# Altium PCB SOM_PCB_BLUETECHNIX.PcbDoc (part 3 of 8)
Units mil, origin at the board's own origin, x right, y up, seen from the top; angles counter-clockwise.
Board outline 1225 x 1620 mil, 8 copper layers (Top Layer, Int1 (Sign), Int2 (GND), Int3 (Sign), Int4 (Sign), Int5 (PWR), Int6 (Sign), Bottom Layer), stack 66.2 mil thick; 65 components, 201 nets, 938 pads, 497 vias.
Unrouted connection lines stored in the file: 25.
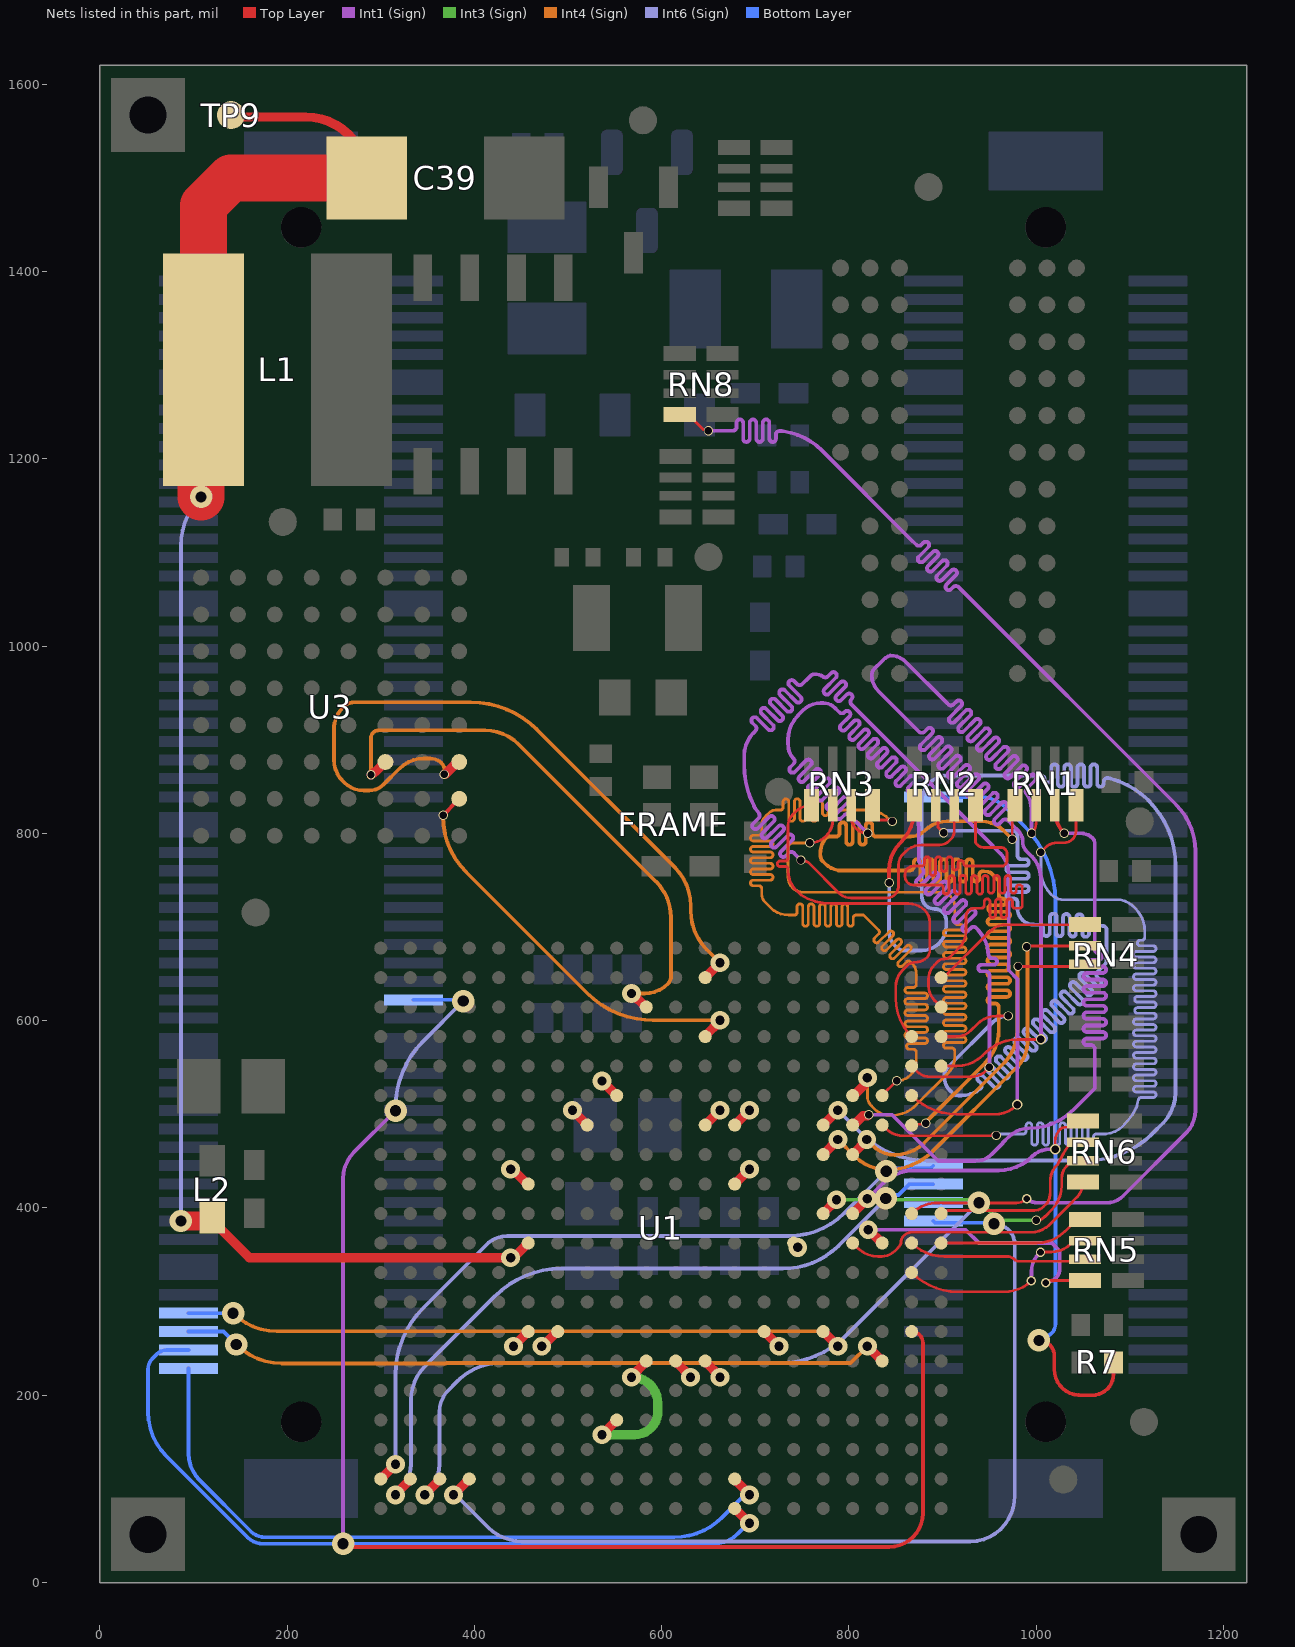
[diagram p8: the nets of this part, all layers, seen from the top]

## Via types
v1: diameter 20, hole 10, Top Layer to Int2 (GND), tented both sides, 68 vias
v2: diameter 10, hole 8, Top Layer to Int3 (Sign), tented both sides, 53 vias
v3: diameter 20, hole 10, Top Layer to Bottom Layer, tented both sides, 44 vias
v4: diameter 10, hole 8, Top Layer to Int1 (Sign), tented both sides, 41 vias
v5: diameter 20, hole 10, Top Layer to Int5 (PWR), tented both sides, 40 vias
v6: diameter 10, hole 8, Top Layer to Int4 (Sign), tented both sides, 33 vias
v7: diameter 20, hole 10, Top Layer to Int3 (Sign), tented both sides, 25 vias
v8: diameter 24, hole 12, Int6 (Sign) to Bottom Layer, tented both sides, 22 vias
v9: diameter 20, hole 10, Top Layer to Int4 (Sign), tented both sides, 19 vias
v10: diameter 24, hole 12, Int4 (Sign) to Bottom Layer, tented both sides, 17 vias
v11: diameter 24, hole 12, Int2 (GND) to Bottom Layer, tented both sides, 15 vias
v12: diameter 20, hole 10, Top Layer to Int1 (Sign), tented both sides, 13 vias
v13: diameter 24, hole 12, Top Layer to Int6 (Sign), tented both sides, 11 vias
v14: diameter 24, hole 12, Top Layer to Int4 (Sign), tented both sides, 10 vias
v15: diameter 24, hole 12, Top Layer to Int3 (Sign), tented both sides, 8 vias
v16: diameter 11, hole 8, Top Layer to Int1 (Sign), tented both sides, 8 vias
v17: diameter 10, hole 8, Top Layer to Bottom Layer, tented both sides, 7 vias
v18: diameter 20, hole 10, Top Layer to Int6 (Sign), tented both sides, 7 vias
v19: diameter 10, hole 8, Top Layer to Int6 (Sign), tented both sides, 6 vias
v20: diameter 10, hole 8, Int4 (Sign) to Bottom Layer, tented both sides, 6 vias
v21: diameter 24, hole 12, Int1 (Sign) to Bottom Layer, tented both sides, 5 vias
v22: diameter 24, hole 12, Top Layer to Int2 (GND), tented both sides, 5 vias
v23: diameter 10, hole 7, Top Layer to Int1 (Sign), tented both sides, 4 vias
v24: diameter 10, hole 8, Top Layer to Int2 (GND), tented both sides, 4 vias
v25: diameter 10, hole 8, Int2 (GND) to Bottom Layer, tented both sides, 4 vias
v26: diameter 24, hole 12, Int3 (Sign) to Bottom Layer, tented both sides, 4 vias
v27: diameter 24, hole 12, Top Layer to Bottom Layer, tented both sides, 4 vias
v28: diameter 10, hole 8, Int5 (PWR) to Bottom Layer, tented both sides, 3 vias
v29: diameter 20, hole 10, Int2 (GND) to Bottom Layer, tented both sides, 2 vias
v30: diameter 10, hole 8, Int6 (Sign) to Bottom Layer, tented both sides, 2 vias
v31: diameter 10, hole 8, Top Layer to Bottom Layer, 1 vias
v32: diameter 22, hole 12, Int2 (GND) to Bottom Layer, tented both sides, 1 vias
v33: diameter 24, hole 10, Int2 (GND) to Bottom Layer, tented both sides, 1 vias
v34: diameter 20, hole 12, Top Layer to Int5 (PWR), tented both sides, 1 vias
v35: diameter 20, hole 12, Top Layer to Int2 (GND), tented both sides, 1 vias
v36: diameter 24, hole 12, Top Layer to Int5 (PWR), tented both sides, 1 vias
v37: diameter 24, hole 12, Top Layer to Int1 (Sign), tented both sides, 1 vias

## Nets (pads, with @x,y where several pads share a name; then routed paths per layer and width w, separated by ;. In a path a pad name is that pad's centre, name@x,y a point inside that pad or via, vN(x,y) a via of type N, cw(c..) or ccw(c..) an arc to the next point about the centre after c; other vN are vias at no path point) (continued)
+VDD_INT: C39.1 L1.2 L2.1 TP9.0 U1.F9 U1.G8 U1.G12 U1.G13 U1.J6 U1.J13 U1.L6 U1.L15 U1.P6 U1.P7 U1.P14 U1.R10 U1.R11 U1.R12 U1.U9 | length 2289.2
  Top Layer w10: L2.1@116.57,386.06 L2.1@120,389.49 120,386.54 159.76,346.77 v3(438.66,346.77) 441.77,346.77 U1.L6@457.52,362.52 ; TP9.0@140.16,1565 220,1565 cw(c220,1500) C39.1@285,1500 ; v3(438.66,441.26) 440.69,441.26 456.44,425.51 U1.J6@457.52,425.51 ; v5(441.77,252.28) U1.P6@457.52,268.03 ; v5(472.01,252.28) 472.64,252.28 488.39,268.03 U1.P7@489.02,268.03 ; v5(504.76,504.25) U1.G8@520.51,488.5 ; v5(536.26,157.8) U1.U9@552.01,173.54 ; v5(536.26,535.5) 536.38,535.5 551.88,520 U1.F9@552.01,520 ; v5(567.76,219.34) 567.76,220.06 583.5,235.81 U1.R10@583.5,236.54 ; U1.R11@615,236.54 615,235.81 630.75,220.06 v5(630.75,219.34) ; U1.R12@646.5,236.54 646.5,235.81 662.24,220.06 v5(662.24,219.34) ; U1.G12@646.5,488.5 v5(662.24,504.25) ; U1.J13@677.99,425.51 v5(693.74,441.26) ; U1.G13@677.99,488.5 v5(693.74,504.25) ; U1.P14@709.49,268.03 v5(725.24,252.28) ; U1.L15@740.98,362.52 745.38,358.12 v5(745.38,357.87)
  Top Layer w20: v13(86.59,386.06) L2.1@116.57,386.06
  Top Layer w50: v13(108.15,1159.32) 108.15,1292.28 L1.2@110.87,1295 110.87,1470.71 140.16,1500 C39.1@285,1500
  Int3 (Sign) w10: v5(536.26,157.8) 570.91,157.8 ccw(c570.91,182.83) 593.52,172.08 ccw(c570.91,182.83) 595.95,182.83 595.95,191.15 ccw(c567.76,191.15) v5(567.76,219.34)
  Int6 (Sign) w4: v13(86.59,386.06) 86.59,1107.27 cw(c160.2,1107.27) v13(108.15,1159.32)
A\O\E\: U1.C10 U3.F6 | length 611.2
  Top Layer w10: v6(289.61,862.71) 291.2,863.57 ccw(c285,875) 294.04,865.66 U3.F6@305,876.26 ; v9(567.76,629) 568.37,629 582.89,614.49 U1.C10@583.5,614.49
  Int4 (Sign) w4: v6(289.61,862.71) 289.61,901.92 cw(c297.69,901.92) 290.4,905.4 cw(c297.69,901.92) 294.22,909.22 cw(c297.69,901.92) 297.69,910 411.31,910 cw(c411.31,858.86) 447.45,895.05 ; 447.47,895.02 593.75,748.75 cw(c554.51,709.51) 610,709.51 610,647.51 cw(c598.3,647.51) 606.57,639.24 cw(c581.86,663.95) 581.86,629 v9(567.76,629)
A\R\E\: U1.B12 U3.F8 | length 803.1
  Top Layer w10: v6(367.93,862.93) 368.51,862.93 381.85,876.26 U3.F8@383.74,876.26 ; U1.B12@646.5,645.98 v9(662.24,661.73)
  Int4 (Sign) w4: v6(367.93,862.93) 367.93,867.93 ccw(c357.93,867.93) 365,875 ccw(c352.93,862.93) 352.93,880 345.84,880 ccw(c345.84,844.03) 320.41,869.47 303,852.06 cw(c287.68,867.38) 287.68,845.71 281.99,845.71 cw(c281.99,875.27) 261.09,854.37 256.9,858.57 cw(c284.14,879.14) 250,879.14 250,910.86 cw(c284.14,910.86) 250.72,917.84 cw(c284.14,910.86) 260,935 cw(c272.07,922.93) 272.07,940 396.14,940 cw(c396.14,840) 466.85,910.71 614.09,763.47 cw(c573.39,722.77) 630.95,722.77 630.95,718.03 ccw(c691.31,718.03) 648.61,675.37 ; 648.63,675.35 v9(662.24,661.73)
A\W\E\: U1.D12 U3.G8 | length 448.6
  Top Layer w4: v6(366.69,819.33) 366.88,819.14 U3.G8@383.25,836.89
  Top Layer w10: U3.G8@383.25,836.89 U3.G8@383.74,836.89 ; U1.D12@646.5,582.99 646.5,583.87 662.24,599.62 v3(662.24,600.5)
  Int4 (Sign) w4: v6(366.69,819.33) 366.69,818.89 366.42,818.63 ccw(c451.62,818.63) 391.37,758.39 519.96,629.79 ccw(c590.67,700.5) 573.57,601.97 ccw(c590.67,700.5) 590.67,600.5 v3(662.24,600.5)
ATAPI_PDIAG: FRAME.134 U1.P19 | length 1522.4
  Top Layer w4: v37(259.75,41.31) 263.06,38 842.88,38 ccw(c842.88,74.08) 878.97,74.08 878.97,256.03 ccw(c866.97,256.03) U1.P19@866.97,268.03
  Int1 (Sign) w4: v37(259.75,41.31) 259.75,431.18 cw(c299.95,431.18) 271.53,459.61 v13(315.79,503.87)
  Int6 (Sign) w4: v13(315.79,503.87) 315.79,507.07 cw(c415.79,507.07) 345.08,577.78 v8(388.15,620.86)
  Bottom Layer w4: FRAME.134@335,622.28 386.73,622.28 v8(388.15,620.86)
B\R\: FRAME.76 R7.2 | length 827.6
  Top Layer w4: v14@1009.94,258.51 v14(1002.85,258.51) cw(c1002.85,242.03) 1019.32,242.03 1019.32,227.41 ccw(c1046.64,227.41) 1045.19,200.13 ccw(c1046.64,227.41) 1046.64,200.09 1060,200.09 ccw(c1060,222.61) 1082.52,222.61 R7.2@1082.52,235
  Bottom Layer w4: FRAME.76@890.12,838.82 939.58,838.82 cw(c939.58,798.74) 967.91,827.09 987.16,807.84 cw(c906.67,727.35) 1020.5,727.35 1020.5,276.15 cw(c1006.4,276.15) 1006.4,262.05 v10@1002.86,258.51
  other v10: 1002.85,258.51
BMODE0: FRAME.60 U1.W1 | length 799.8
  Top Layer w10: U1.W1@300.04,110.55 v3(315.79,126.3)
  Int6 (Sign) w4: v3(315.79,126.3) 315.79,170.1 315.79,222.13 cw(c415.79,222.13) 345.08,292.84 414.99,362.75 cw(c435.32,337.85) 435.32,370 735.7,370 ccw(c735.7,454.06) 795.1,394.58 ccw(c735.7,454.06) 795.14,394.62 v8(839.73,439.21)
  Bottom Layer w4: v8(839.73,439.21) 842.68,442.17 887.17,442.17 FRAME.60@890.12,445.12
BMODE1: FRAME.59 U1.W2 | length 785.7
  Top Layer w10: v3(315.79,93.55) 315.79,94.18 331.54,109.92 U1.W2@331.54,110.55
  Int6 (Sign) w4: v3(315.79,93.55) 315.79,94.8 v3@321.57,100.59 ; v3@321.59,100.61 ccw(c295.72,126.44) 332.28,126.44 332.28,174.98 332.28,194.86 cw(c383.5,194.86) 347.25,231.04 ; 347.28,231.07 422.17,305.96 cw(c492.88,235.25) 492.88,335.25 729.44,335.25 ccw(c729.44,420.02) 760.4,341.1 ccw(c729.44,420.02) 789.38,360.08 v8(839.41,410.1)
  Bottom Layer w4: v8(839.41,410.1) 843.24,413.93 853.03,413.93 864.53,425.43 FRAME.59@890.12,425.43
BMODE2: FRAME.58 U1.W3 | length 833.7
  Top Layer w10: v3(347.06,93.55) 347.06,94.07 363.03,110.03 U1.W3@363.03,110.55
  Int6 (Sign) w4: v3(347.06,93.55) 347.06,93.86 348.31,95.83 351.22,98.74 ccw(c323.66,126.3) 362.64,126.3 362.64,181.98 cw(c396.38,181.98) 370.41,203.51 382.65,215.76 cw(c427.51,170.91) 385.56,218.49 cw(c427.51,170.91) 423.57,234.22 cw(c427.51,170.91) 427.51,234.34 726.16,234.34 ccw(c726.16,334.34) 796.87,263.63 v8(938.75,405.52)
  Bottom Layer w4: FRAME.58@890.12,405.75 890.23,405.63 938.64,405.63 v8(938.75,405.52)
BMODE3: FRAME.57 U1.W4 | length 1038.5
  Top Layer w10: v3(377.76,93.55) 377.76,93.67 394.53,110.43 U1.W4@394.53,110.55
  Int6 (Sign) w4: v3(377.76,93.55) 380.03,93.55 414.59,59 ccw(c451.35,95.77) 451.35,43.77 929.58,43.77 ccw(c929.58,90.1) 962.34,57.34 ccw(c926.94,92.73) 977,92.73 977,361.45 ccw(c955.94,361.45) 956.73,382.5 v8(954.91,383.02)
  Bottom Layer w4: FRAME.57@890.12,386.06 891.89,384.29 951.98,384.29 v8(954.91,383.02)
CAN0_RX: FRAME.153 U1.R18 | length 765.8
  Top Layer w10: v9(819.72,252.28) U1.R18@835.47,236.54
  Int4 (Sign) w4: v10(145.83,254.17) ccw(c194.5,302.85) 194.5,234.01 369.56,234.01 369.89,234.34 801.78,234.34 v9(819.72,252.28)
  Bottom Layer w4: FRAME.153@94.84,267.95 132.05,267.95 v10(145.83,254.17)
CAN0_TX: FRAME.154 U1.P16 | length 727.5
  Top Layer w10: U1.P16@772.48,268.03 v9(788.23,252.28)
  Int4 (Sign) w4: v10(142.36,287.64) ccw(c189.21,334.49) 189.21,268.23 772.28,268.23 v9(788.23,252.28)
  Bottom Layer w4: FRAME.154@94.84,287.64 v10(142.36,287.64)
CAN1_RX: FRAME.151 U1.W13 | length 772.9
  Top Layer w10: U1.W13@677.99,110.55 677.99,109.92 693.74,94.18 v3(693.74,93.55)
  Bottom Layer w4: FRAME.151@94.84,228.58 94.84,137.51 ccw(c134.41,137.51) 106.43,109.53 161.27,54.69 ; 161.29,54.67 ccw(c176.68,70.1) 176.68,48.31 613.35,48.31 ccw(c613.35,120.63) 664.44,69.44 664.51,69.51 688.33,93.33 v3(693.74,93.55)
CAN1_TX: FRAME.152 U1.Y13 | length 842.6
  Top Layer w10: U1.Y13@677.99,79.06 v3(693.74,63.31)
  Bottom Layer w4: FRAME.152@94.84,248.27 71.22,248.27 ccw(c71.22,234.01) 61.14,244.09 56.34,239.29 ccw(c67.93,227.7) 51.54,227.7 51.54,182.36 ccw(c118.74,182.36) 71.22,134.84 157.75,48.31 ccw(c174.65,65.21) 174.65,41.31 655.09,41.31 ccw(c655.09,78.86) 681.62,52.28 ; 681.65,52.31 692.65,63.31 v3(693.74,63.31)
DDR_A0: RN1.1 U1.G19 | length 1410
  Top Layer w3: U1.G19@866.97,488.5 867.91,489.45 880.9,489.45 v6(881.84,490.39) ; v6(974.41,793.78) 974.41,827.05 RN1.1@977.36,830
  Int4 (Sign) w4: 788.77,760.44 791.89,760.44 ; 880.85,802.82 cw(c865.72,817.97) 865.72,796.56 841.5,796.56 829,796.56 cw(c829,800.56) 825,800.56 825,808.27 ccw(c821.5,808.27) 818,808.27 818,791.27 cw(c814.5,791.27) 811,791.27 811,808.27 ccw(c807.5,808.27) 804,808.27 804,791.27 cw(c800.5,791.27) 797,791.27 797,808.27 ccw(c793.5,808.27) 790,808.27 790,800.56 cw(c786,800.56) 786,796.56 784,796.56 778.72,796.56 ccw(c778.72,792.84) 776.08,795.47 ccw(c792.05,779.5) 769.58,781.77 ccw(c792.05,779.5) 769.47,779.5 769.47,777.49 ccw(c783.93,777.49) 770.77,771.5 774.71,767.56 ccw(c791.89,784.75) 791.89,760.44 ; 880.88,802.86 cw(c905,778.69) 905,812.83 941.21,812.83 cw(c941.21,778.69) 965.33,802.86 v6(974.41,793.78) ; v6(881.84,490.39) 881.84,491.25 945.44,554.86 ccw(c910.3,590) 960,590 960,612.35 960,614.35 ccw(c956,614.35) 956,618.35 951.5,618.35 cw(c951.5,621.85) 951.5,625.35 968.5,625.35 ccw(c968.5,628.85) 968.5,632.35 951.5,632.35 cw(c951.5,635.85) 951.5,639.35 968.5,639.35 ccw(c968.5,642.85) 968.5,646.35 951.5,646.35 cw(c951.5,649.85) 951.5,653.35 967.07,653.35 ccw(c967.07,656.85) 967.07,660.35 951.5,660.35 cw(c951.5,663.85) 951.5,667.35 968.5,667.35 ccw(c968.5,670.85) 968.5,674.35 951.5,674.35 cw(c951.5,677.85) 951.5,681.35 968.5,681.35 ccw(c968.5,684.85) 968.5,688.35 951.5,688.35 cw(c951.5,691.85) 951.5,695.35 968.5,695.35 ccw(c968.5,698.85) 968.5,702.35 951.5,702.35 cw(c951.5,705.85) 951.5,709.35 968.5,709.35 ccw(c968.5,712.85) 968.5,716.35 952.24,716.35 cw(c952.24,719.85) 952.24,723.35 964,723.35 ccw(c964,726.85) 964,730.35 cw(c964,734.35) 960,734.35 960,743.54 960,749.26 951.2,758.06 ccw(c937.33,718.85) 950.56,758.28 ccw(c937.33,718.85) 948.56,758.89 943.76,759.56 ccw(c943.21,755.59) 939.21,755.59 939.21,751.94 cw(c935.71,751.94) 932.21,751.94 932.21,768.94 ccw(c928.71,768.94) 925.21,768.94 925.21,751.94 cw(c921.71,751.94) 918.21,751.94 918.21,768.94 ccw(c914.71,768.94) 911.21,768.94 911.21,751.94 cw(c907.71,751.94) 904.21,751.94 904.21,768.94 ccw(c900.71,768.94) 897.21,768.94 897.21,751.94 cw(c893.71,751.94) 890.21,751.94 890.21,768.94 ccw(c886.71,768.94) 883.21,768.94 883.21,751.94 cw(c879.71,751.94) 876.21,751.94 876.21,768.94 ccw(c872.71,768.94) 869.21,768.94 869.21,764.44 cw(c865.21,764.44) 865.21,760.44 863.21,760.44 791.89,760.44
DDR_A1: RN1.3 U1.G17 | length 921
  Top Layer w4: v4@820.04,498.45 v4(821.19,499.6) ; RN1.3@1019.68,830 1019.68,824.9 ccw(c1054.9,824.9) v4(1030,800)
  Top Layer w10: U1.G17@803.98,488.5 805.06,488.5 815,498.45 v4@820.04,498.45
  Int1 (Sign) w4: v4(821.19,499.6) 845.85,499.6 895.44,450 935,450 ccw(c935,474.14) 952.07,457.07 964.5,469.5 964.5,469.78 970.65,475.93 970.93,475.93 971.72,476.72 cw(c991.72,456.72) 974.7,479.31 cw(c991.72,456.72) 991.72,485 ccw(c991.72,553.28) 1040,505 1062.5,527.5 1062.5,567.9 1062.5,569.9 ccw(c1058.5,569.9) 1058.5,573.9 1054,573.9 cw(c1054,577.4) 1054,580.9 1071,580.9 ccw(c1071,584.4) 1071,587.9 1054,587.9 cw(c1054,591.4) 1054,594.9 1071,594.9 ccw(c1071,598.4) 1071,601.9 1054,601.9 cw(c1054,605.4) 1054,608.9 1071,608.9 ccw(c1071,612.4) 1071,615.9 1054,615.9 cw(c1054,619.4) 1054,622.9 1071,622.9 ccw(c1071,626.4) 1071,629.9 1054,629.9 cw(c1054,633.4) 1054,636.9 1071,636.9 ccw(c1071,640.4) 1071,643.9 1054,643.9 cw(c1054,647.4) 1054,650.9 1071,650.9 ccw(c1071,654.4) 1071,657.9 1055.73,657.9 cw(c1055.73,661.4) 1055.73,664.9 1066.5,664.9 ccw(c1066.5,668.4) 1066.5,671.9 cw(c1066.5,675.9) 1062.5,675.9 1062.5,709.37 1062.5,740.14 1062.5,788.96 ccw(c1053.96,788.96) 1060,795 ccw(c1047.93,782.93) 1047.93,800 v4(1030,800)
DDR_A2: RN1.2 U1.E20 | length 1624.5
  Top Layer w3: U1.E20@898.46,551.5 914.98,551.5 ccw(c914.98,591.37) 943.17,563.17 945.75,565.75 cw(c980.16,531.34) 980.16,580 v16(1005,580) ; v4(995,800) ccw(c982.93,812.07) 998.74,805.63 ccw(c982.93,812.07) 1000,812.07 RN1.2@1000,830
  Int1 (Sign) w4: 924.72,931.07 912.7,919.05 cw(c910.23,921.53) 907.75,919.05 cw(c910.23,921.53) 907.75,924 919.78,936.02 ccw(c917.3,938.5) 919.78,940.97 ccw(c917.3,938.5) 914.83,940.97 911.64,937.79 cw(c908.81,940.62) 905.99,937.79 904.57,939.2 860.75,983.03 ccw(c844.12,966.4) 844.12,989.92 ccw(c850,972.14) 836.76,985.38 835,983.62 827.37,976 ccw(c834.57,968.8) 824.39,968.8 ccw(c847.94,968.8) 831.29,952.15 870.1,913.33 874.92,908.51 ccw(c877.75,911.34) 880.58,908.51 883.76,911.69 cw(c886.24,909.22) 888.71,911.69 cw(c886.24,909.22) 888.71,906.74 876.69,894.72 ccw(c879.17,892.25) 876.69,889.77 ccw(c879.17,892.25) 881.64,889.77 893.66,901.79 cw(c896.14,899.32) 898.61,901.79 cw(c896.14,899.32) 898.61,896.84 886.59,884.82 ccw(c889.06,882.35) 886.59,879.87 ccw(c889.06,882.35) 891.54,879.87 903.56,891.9 cw(c906.04,889.42) 908.51,891.9 cw(c906.04,889.42) 908.51,886.95 896.49,874.92 ccw(c898.96,872.45) 896.49,869.97 ccw(c898.96,872.45) 901.44,869.97 913.46,882 cw(c915.93,879.52) 918.41,882 cw(c915.93,879.52) 918.41,877.05 906.39,865.03 ccw(c908.86,862.55) 906.39,860.08 ccw(c908.86,862.55) 911.34,860.08 923.36,872.1 cw(c925.83,869.62) 928.31,872.1 cw(c925.83,869.62) 928.31,867.15 916.29,855.13 ccw(c918.76,852.65) 916.29,850.18 ccw(c918.76,852.65) 921.24,850.18 933.26,862.2 cw(c935.73,859.72) 938.21,862.2 cw(c935.73,859.72) 938.21,857.25 926.19,845.23 ccw(c928.66,842.75) 926.19,840.28 ccw(c928.66,842.75) 931.14,840.28 943.16,852.3 cw(c945.63,849.82) 948.11,852.3 cw(c945.63,849.82) 948.11,847.35 936.09,835.33 ccw(c938.56,832.85) 936.09,830.38 ccw(c938.56,832.85) 941.04,830.38 953.06,842.4 cw(c955.53,839.92) 958.01,842.4 cw(c955.53,839.92) 958.01,837.45 945.99,825.43 ccw(c948.46,822.95) 945.99,820.48 ccw(c948.46,822.95) 950.94,820.48 962.96,832.5 cw(c965.43,830.02) 967.91,832.5 cw(c965.43,830.02) 967.91,827.55 955.89,815.53 ccw(c958.36,813.05) 955.89,810.58 ccw(c958.36,813.05) 960.84,810.58 964.02,813.76 cw(c966.85,810.93) 969.67,813.76 ; 924.72,931.07 cw(c927.2,928.6) 929.67,931.07 cw(c927.2,928.6) 929.67,926.12 917.65,914.1 ccw(c920.13,911.63) 917.65,909.15 ccw(c920.13,911.63) 922.6,909.15 934.62,921.17 cw(c937.1,918.7) 939.57,921.17 cw(c937.1,918.7) 939.57,916.22 927.55,904.2 ccw(c930.03,901.73) 927.55,899.25 ccw(c930.03,901.73) 932.5,899.25 944.52,911.27 cw(c947,908.8) 949.47,911.27 cw(c947,908.8) 949.47,906.32 937.45,894.3 ccw(c939.93,891.83) 937.45,889.35 ccw(c939.93,891.83) 942.4,889.35 954.42,901.37 cw(c956.9,898.9) 959.37,901.37 cw(c956.9,898.9) 959.37,896.42 947.35,884.4 ccw(c949.83,881.93) 947.35,879.45 ccw(c949.83,881.93) 952.3,879.45 964.32,891.47 cw(c966.8,889) 969.27,891.47 cw(c966.8,889) 969.27,886.52 957.25,874.5 ccw(c959.73,872.03) 957.25,869.55 ccw(c959.73,872.03) 962.2,869.55 974.22,881.58 cw(c976.7,879.1) 979.17,881.58 cw(c976.7,879.1) 979.17,876.63 967.15,864.6 ccw(c969.63,862.13) 967.15,859.65 ccw(c969.63,862.13) 972.1,859.65 984.12,871.68 cw(c986.6,869.2) 989.07,871.68 cw(c986.6,869.2) 989.07,866.73 977.05,854.71 ccw(c979.53,852.23) 977.05,849.76 ccw(c979.53,852.23) 982,849.76 994.02,861.78 cw(c996.5,859.3) 998.97,861.78 cw(c996.5,859.3) 998.97,856.83 989.83,847.68 ccw(c992.66,844.85) 989.15,842.92 993.26,835.49 cw(c925.68,820.06) 993.75,833.15 cw(c925.68,820.06) 995,820.06 v4(995,800) ; 969.68,813.76 971.09,812.35 974.41,809.03 980.93,802.51 cw(c969.89,791.47) 985.5,791.47 ccw(c1001.11,791.47) 990.07,780.43 995.25,775.25 cw(c971.71,751.71) 1005,751.71 v16(1005,580)
DDR_A3: RN1.4 U1.G18 | length 1569.7
  Top Layer w3: U1.G18@835.47,488.5 838.96,485.02 ccw(c858.32,504.39) 858.32,477 951.55,477 953.43,478.88 953.6,478.71 956.09,478.71 v19(957.43,477.37) ; v19(1004.95,779.95) 1010,785 cw(c1022.07,772.93) 1022.07,790 1029.82,790 ccw(c1029.82,802.5) 1038.66,793.66 ccw(c1029.81,802.5) 1042.32,802.5 RN1.4@1042.32,830
  Int6 (Sign) w3: v19(957.43,477.37) 957.43,479 984.7,479 986.2,479 ccw(c986.2,482) 989.2,482 989.2,488 cw(c992.2,488) 995.2,488 995.2,470 ccw(c998.2,470) 1001.2,470 1001.2,488 cw(c1004.2,488) 1007.2,488 1007.2,470 ccw(c1010.2,470) 1013.2,470 1013.2,488 cw(c1016.2,488) 1019.2,488 1019.2,470 ccw(c1022.2,470) 1025.2,470 1025.2,488 cw(c1028.2,488) 1031.2,488 1031.2,470 ccw(c1034.2,470) 1037.2,470 1037.2,488 cw(c1040.2,488) 1043.2,488 1043.2,470 ccw(c1046.2,470) 1049.2,470 1049.2,488 cw(c1052.2,488) 1055.2,488 1055.2,470 ccw(c1058.2,470) 1061.2,470 1061.2,476 cw(c1064.2,476) 1064.2,479 1072.06,479 1073.41,479.04 ccw(c1072.06,507.94) 1074.91,479.15 ccw(c1072.06,507.94) 1092.52,487.48 ccw(c1036.06,543.94) 1106.26,505.9 ccw(c1036.06,543.94) 1107.06,507.4 1109.04,515.61 cw(c1111.96,514.9) 1111.96,517.9 1124.9,517.9 ccw(c1124.9,520.9) 1124.9,523.9 1106.9,523.9 cw(c1106.9,526.9) 1106.9,529.9 1124.9,529.9 ccw(c1124.9,532.9) 1124.9,535.9 1106.9,535.9 cw(c1106.9,538.9) 1106.9,541.9 1124.9,541.9 ccw(c1124.9,544.9) 1124.9,547.9 1106.9,547.9 cw(c1106.9,550.9) 1106.9,553.9 1124.9,553.9 ccw(c1124.9,556.9) 1124.9,559.9 1106.9,559.9 cw(c1106.9,562.9) 1106.9,565.9 1124.9,565.9 ccw(c1124.9,568.9) 1124.9,571.9 1106.9,571.9 cw(c1106.9,574.9) 1106.9,577.9 1124.9,577.9 ccw(c1124.9,580.9) 1124.9,583.9 1106.9,583.9 cw(c1106.9,586.9) 1106.9,589.9 1124.9,589.9 ccw(c1124.9,592.9) 1124.9,595.9 1106.9,595.9 cw(c1106.9,598.9) 1106.9,601.9 1124.9,601.9 ccw(c1124.9,604.9) 1124.9,607.9 1108.14,607.9 cw(c1108.14,610.9) 1108.14,613.9 1124.9,613.9 ccw(c1124.9,616.9) 1124.9,619.9 1108.14,619.9 cw(c1108.14,622.9) 1108.14,625.9 1124.9,625.9 ccw(c1124.9,628.9) 1124.9,631.9 1106.9,631.9 cw(c1106.9,634.9) 1106.9,637.9 1124.9,637.9 ccw(c1124.9,640.9) 1124.9,643.9 1106.9,643.9 cw(c1106.9,646.9) 1106.9,649.9 1124.9,649.9 ccw(c1124.9,652.9) 1124.9,655.9 1106.9,655.9 cw(c1106.9,658.9) 1106.9,661.9 1124.9,661.9 ccw(c1124.9,664.9) 1124.9,667.9 1106.9,667.9 cw(c1106.9,670.9) 1106.9,673.9 1124.9,673.9 ccw(c1124.9,676.9) 1124.9,679.9 1110.92,679.9 cw(c1110.92,682.9) 1110.92,685.9 1112.9,685.9 ccw(c1112.9,688.9) 1115.9,688.9 1115.9,695.33 1115.7,699.09 ccw(c1080.46,695.33) 1115.51,700.59 ccw(c1080.46,695.33) 1105.52,720.39 ccw(c1082.33,697.2) 1090,729.09 1029.35,729.09 cw(c1029.35,747.94) 1016.02,734.61 cw(c1042.75,761.34) 1004.95,761.34 v19(1004.95,779.95)
DDR_A4: RN2.1 U1.G16 | length 1572.5
  Top Layer w4: v19(842.97,747.44) 842.7,748.87 842.7,760.28 cw(c884.76,760.28) 842.71,760.81 cw(c884.76,760.28) 855.02,790.02 ; 855.04,790.04 ccw(c818.76,826.28) 870.04,826.28 RN2.1@870.04,830
  Top Layer w10: U1.G16@772.48,488.5 v18(788.23,504.25)
  Int6 (Sign) w4: v18(788.23,504.25) 812.59,479.89 ccw(c883.3,550.6) 883.3,450.6 1053.91,450.6 ccw(c1053.91,550.6) 1124.62,479.89 1135.13,490.39 ccw(c1102.02,523.5) 1148.84,523.5 1148.84,765.38 ccw(c1050.38,765.38) 1120,835 ccw(c1055.42,770.42) 1080.02,858.37 ccw(c1055.42,770.42) 1078.02,858.91 1076.52,859.1 ccw(c1076.02,855.13) 1072.02,855.13 1072.02,853.25 cw(c1068.52,853.25) 1065.02,853.25 1065.02,870.25 ccw(c1061.52,870.25) 1058.02,870.25 1058.02,853.25 cw(c1054.52,853.25) 1051.02,853.25 1051.02,870.25 ccw(c1047.52,870.25) 1044.02,870.25 1044.02,853.25 cw(c1040.52,853.25) 1037.02,853.25 1037.02,870.25 ccw(c1033.52,870.25) 1030.02,870.25 1030.02,853.25 cw(c1026.52,853.25) 1023.02,853.25 1023.02,870.25 ccw(c1019.52,870.25) 1016.02,870.25 1016.02,857.68 cw(c1012.52,857.68) 1009.02,857.68 1009.02,857.75 ccw(c1005.02,857.75) 1005.02,861.75 994.1,861.75 905.46,861.75 ccw(c905.46,834.05) 877.75,834.05 877.75,833.15 877.75,766.44 877.75,733.07 ccw(c891.55,733.07) 883.65,721.76 ccw(c891.55,733.07) 891.55,719.27 cw(c891.55,706.99) 903.83,706.99 903.83,701.02 cw(c877.76,701.02) 877.76,674.95 856.65,674.95 cw(c863.81,693.71) 849.61,679.51 846.92,682.2 cw(c869.98,696.77) 842.7,696.77 ; 842.7,696.79 v19(842.97,747.44)
DDR_A5: RN2.3 U1.F19 | length 1595.7
  Top Layer w3: v4(748.73,771.5) cw(c748.73,758.77) 757.72,767.78 ; 757.73,767.77 789.11,736.4 ccw(c802.14,749.43) 802.14,731 839.97,731 ccw(c839.97,743.95) 849.13,734.79 ccw(c839.97,743.94) 851.78,738.63 ccw(c839.97,743.94) 852.92,743.94 852.92,766.6 cw(c868.4,766.6) 857.45,777.55 860.21,780.31 cw(c877.82,762.7) 877.82,787.6 896.63,787.6 ccw(c896.63,802.13) 906.9,791.86 910.6,795.56 ccw(c897.35,802.62) 912.36,802.62 RN2.3@912.36,830 ; U1.F19@866.97,520 ccw(c915.25,568.28) 884.03,507.56 ccw(c915.25,568.28) 915.18,500 ccw(c915.25,568.28) 915.25,500 955.4,500 ccw(c955.4,535.31) 978.76,508.83 v16(979.71,510.44)
  Int1 (Sign) w4: 698.02,907.27 ccw(c721.95,883.38) 688.14,883.38 688.14,873.52 ccw(c788.14,873.52) 698.63,828.92 ccw(c788.14,873.52) 699.59,827.05 703.82,821.29 cw(c700.6,818.92) 703.43,816.09 697.77,810.44 ccw(c700.25,807.96) 697.77,805.49 ccw(c700.25,807.96) 702.72,805.49 714.75,817.51 cw(c717.22,815.03) 719.69,817.51 cw(c717.22,815.03) 719.69,812.56 707.67,800.54 ccw(c710.15,798.06) 707.67,795.59 ccw(c710.15,798.06) 712.62,795.59 724.64,807.61 cw(c727.12,805.13) 729.59,807.61 cw(c727.12,805.13) 729.59,802.66 717.57,790.64 ccw(c720.05,788.16) 717.57,785.69 ccw(c720.05,788.16) 722.52,785.69 734.54,797.71 cw(c737.02,795.23) 739.49,797.71 cw(c737.02,795.23) 739.49,792.76 727.47,780.74 ccw(c729.95,778.26) 727.47,775.79 ccw(c729.95,778.26) 732.42,775.79 735.6,778.97 cw(c738.43,776.14) 741.26,778.97 742.68,777.56 v4(748.73,771.5) ; 698.04,907.29 698.58,907.83 700,909.25 ccw(c697.17,912.08) 700,914.9 696.82,918.09 cw(c699.29,920.56) 696.82,923.04 cw(c699.29,920.56) 701.77,923.04 713.79,911.02 ccw(c716.26,913.49) 718.74,911.02 ccw(c716.26,913.49) 718.74,915.96 706.72,927.99 cw(c709.19,930.46) 706.72,932.94 cw(c709.19,930.46) 711.67,932.94 723.69,920.91 ccw(c726.16,923.39) 728.64,920.91 ccw(c726.16,923.39) 728.64,925.86 716.61,937.89 cw(c719.09,940.36) 716.62,942.84 cw(c719.09,940.36) 721.56,942.84 733.59,930.81 ccw(c736.06,933.29) 738.54,930.81 ccw(c736.06,933.29) 738.54,935.76 726.51,947.78 cw(c728.99,950.26) 726.51,952.73 cw(c728.99,950.26) 731.46,952.73 743.49,940.71 ccw(c745.96,943.19) 748.43,940.71 ccw(c745.96,943.19) 748.43,945.66 736.41,957.68 cw(c738.89,960.16) 736.41,962.63 cw(c738.89,960.16) 741.36,962.63 744.55,959.45 ccw(c747.37,962.28) 750.2,959.45 756.73,965.98 758.79,968.04 cw(c763.53,963.3) 763.53,970 cw(c763.53,953.93) 770,968.64 cw(c763.53,953.93) 771.86,967.67 772.24,967.37 ccw(c774.71,970.52) 777.54,967.69 781.03,971.18 cw(c783.5,968.7) 785.98,971.18 cw(c783.5,968.7) 785.98,966.23 773.95,954.21 ccw(c776.43,951.73) 773.95,949.26 ccw(c776.43,951.73) 778.9,949.26 790.93,961.28 cw(c793.4,958.8) 795.88,961.28 cw(c793.4,958.8) 795.88,956.33 786.67,947.12 ccw(c789.14,944.65) 786.67,942.17 ccw(c789.14,944.65) 791.62,942.17 797.74,948.29 cw(c800.21,945.82) 802.69,948.29 cw(c800.21,945.82) 802.69,943.34 802.59,943.25 ccw(c805.42,940.42) 802.59,937.59 952.77,787.42 955.18,785 961.67,778.51 ; 961.68,778.5 cw(c940.17,757.02) 970.57,757.02 970.57,744.43 970.57,653.75 980,644.32 980,604.94 v16(979.71,510.44)
DDR_A6: RN2.2 U1.D20 | length 1520.3
  Top Layer w3: RN2.2@892.68,830 895,827.68 895,806.48 v19(900.99,800.49) ; U1.D20@898.46,582.99 914.26,582.99 ccw(c914.26,605.94) 930.47,589.69 ; 930.49,589.71 937.21,596.44 ; 937.23,596.45 cw(c957.89,575.76) 957.89,605 v19(970,605)
  Int6 (Sign) w4: v19(900.99,800.49) 902.62,800.49 904.96,802.83 974.41,802.83 cw(c974.41,797.24) 980,797.24 980,795.46 980,776.44 ccw(c984,776.44) 984,772.44 988.5,772.44 cw(c988.5,768.94) 988.5,765.44 971.5,765.44 ccw(c971.5,761.94) 971.5,758.44 988.5,758.44 cw(c988.5,754.94) 988.5,751.44 971.5,751.44 ccw(c971.5,747.94) 971.5,744.44 988.5,744.44 cw(c988.5,740.94) 988.5,737.44 971.5,737.44 ccw(c971.5,733.94) 971.5,730.44 976,730.44 cw(c976,726.44) 980,726.44 980,724.44 980,720 ccw(c997.52,720) 980.22,717.21 ccw(c997.52,720) 994.73,702.7 995.28,702.69 997.28,702.65 1003.51,702.52 cw(c1003.43,698.52) 1007.43,698.44 1007.33,693.94 ccw(c1010.83,693.86) 1010.76,690.37 ccw(c1010.83,693.86) 1014.33,693.79 1014.69,710.79 cw(c1018.19,710.71) 1021.69,710.64 1021.33,693.65 ccw(c1024.83,693.57) 1024.76,690.07 ccw(c1024.83,693.57) 1028.33,693.5 1028.68,710.49 cw(c1032.18,710.42) 1032.26,713.92 cw(c1032.18,710.42) 1035.68,710.35 1035.33,693.35 ccw(c1038.83,693.28) 1038.75,689.78 ccw(c1038.83,693.28) 1042.33,693.21 1042.68,710.2 cw(c1046.18,710.13) 1049.68,710.06 1049.32,693.06 ccw(c1052.82,692.99) 1052.75,689.49 ccw(c1052.82,692.99) 1056.32,692.91 1056.42,697.41 cw(c1060.42,697.33) 1060.5,701.33 1062.5,701.29 1071.07,701.11 cw(c1071,697.11) 1075,697.11 1075,693.98 1075,663.56 cw(c1071,663.53) 1073.86,660.74 1066.78,653.48 1065.39,652.04 1065.35,652.01 ccw(c1068.21,649.22) 1065.39,646.39 1068.77,643 cw(c1066.3,640.53) 1068.77,638.05 cw(c1066.3,640.53) 1063.82,638.05 1051.8,650.07 ccw(c1049.33,647.6) 1046.85,650.07 ccw(c1049.33,647.6) 1046.85,645.12 1058.87,633.1 cw(c1056.4,630.63) 1058.87,628.15 cw(c1056.4,630.63) 1053.92,628.15 1041.9,640.17 ccw(c1039.43,637.7) 1036.95,640.17 ccw(c1039.43,637.7) 1036.95,635.22 1048.97,623.2 cw(c1046.5,620.73) 1048.97,618.25 cw(c1046.5,620.73) 1044.02,618.25 1032,630.27 ccw(c1029.53,627.8) 1027.05,630.27 ccw(c1029.53,627.8) 1027.05,625.32 1039.07,613.3 cw(c1036.6,610.83) 1039.07,608.35 cw(c1036.6,610.83) 1034.12,608.35 1022.1,620.37 ccw(c1019.63,617.9) 1017.15,620.37 ccw(c1019.63,617.9) 1017.15,615.42 1029.17,603.4 cw(c1026.7,600.93) 1029.17,598.45 cw(c1026.7,600.93) 1024.23,598.45 1012.2,610.47 ccw(c1009.73,608) 1007.25,610.47 ccw(c1009.73,608) 1007.25,605.52 1019.28,593.5 cw(c1016.8,591.03) 1019.28,588.55 cw(c1016.8,591.03) 1014.33,588.55 1002.3,600.57 ccw(c999.83,598.1) 997.35,600.57 ccw(c999.83,598.1) 997.35,595.62 1009.38,583.6 cw(c1006.9,581.13) 1009.38,578.65 cw(c1006.9,581.13) 1004.43,578.65 992.41,590.67 ccw(c989.93,588.2) 987.46,590.67 ccw(c989.93,588.2) 987.46,585.72 999.48,573.7 cw(c997,571.23) 999.48,568.75 cw(c997,571.23) 994.53,568.75 982.51,580.77 ccw(c980.03,578.3) 977.56,580.77 ccw(c980.03,578.3) 977.56,575.83 989.58,563.8 cw(c987.1,561.33) 989.58,558.85 cw(c987.1,561.33) 984.63,558.85 972.61,570.88 ccw(c970.13,568.4) 967.66,570.88 ccw(c970.13,568.4) 967.66,565.93 979.68,553.9 cw(c977.2,551.43) 979.68,548.95 cw(c977.2,551.43) 974.73,548.95 962.71,560.98 ccw(c960.23,558.5) 957.76,560.98 ccw(c960.23,558.5) 957.76,556.03 969.78,544.01 cw(c967.3,541.53) 969.78,539.06 cw(c967.3,541.53) 964.83,539.06 952.81,551.08 ccw(c950.33,548.6) 947.86,551.08 ccw(c950.33,548.6) 947.86,546.13 959.88,534.11 cw(c957.4,531.63) 959.88,529.16 cw(c957.4,531.63) 954.93,529.16 942.91,541.18 ccw(c940.43,538.7) 937.96,541.18 ccw(c940.43,538.7) 937.96,536.23 940.76,533.42 cw(c937.93,530.59) 940.36,527.41 936.49,524.46 cw(c919.61,554.14) 934.64,523.49 cw(c919.61,554.14) 919.61,520 cw(c919.61,542.64) 914.47,520.59 cw(c914.47,524.91) 912.16,521.26 cw(c914.47,524.91) 911.42,521.86 907.9,525.37 cw(c922.54,540) 902.06,537.06 cw(c922.54,540) 901.84,540 cw(c917.82,540) 906.52,551.3 953.32,598.09 cw(c970,581.4) v19(970,605)
DDR_A7: RN2.4 U1.C20 | length 940.5
  Top Layer w3: U1.C20@898.46,614.49 891.73,621.22 cw(c907.99,637.47) 885,637.47 885,644.24 cw(c906.74,644.24) 891.37,659.61 894.83,663.07 cw(c901.86,656.03) 901.86,665.98 ccw(c901.86,675.93) 908.89,668.89 916.95,676.95 ccw(c897.51,696.39) 925,696.39 925,711.46 cw(c933.54,711.46) 927.49,717.49 cw(c933.54,711.46) 933.54,720 940,720 941.5,720 ccw(c941.5,723) 944.5,723 944.5,727 cw(c947.5,727) 950.5,727 950.5,713 ccw(c953.5,713) 956.5,713 956.5,727 cw(c959.5,727) 962.5,727 962.5,713 ccw(c965.5,713) 968.5,713 968.5,727 cw(c971.5,727) 974.5,727 974.5,723 ccw(c977.5,723) 977.5,720 982.23,720 983.24,720 985,721.76 985,743.24 983.24,745 981.74,745 ccw(c981.74,742) 978.74,742 978.74,739 cw(c975.74,739) 972.74,739 972.74,752 ccw(c969.74,752) 966.74,752 966.74,739 cw(c963.74,739) 960.74,739 960.74,752 ccw(c957.74,752) 954.74,752 954.74,739 cw(c951.74,739) 948.74,739 948.74,752 ccw(c945.74,752) 942.74,752 942.74,738 cw(c939.74,738) 936.74,738 936.74,752 ccw(c933.74,752) 930.74,752 930.74,738 cw(c927.74,738) 924.74,738 924.74,752 ccw(c921.74,752) 918.74,752 918.74,738 cw(c915.74,738) 912.74,738 912.74,752 ccw(c909.74,752) 906.74,752 906.74,738 cw(c903.74,738) 900.74,738 900.74,742 ccw(c897.74,742) 897.74,745 894.75,745 891.76,745 868.54,745 cw(c868.54,753.54) 862.51,747.49 cw(c868.54,753.54) 860,753.54 860,756.77 cw(c867.8,756.77) 862.29,762.29 cw(c868.84,755.73) 868.84,765 876.02,765 877.52,765 ccw(c877.52,768) 880.52,768 880.52,772 cw(c883.52,772) 886.52,772 886.52,758 ccw(c889.52,758) 892.52,758 892.52,772 cw(c895.52,772) 898.52,772 898.52,762.42 ccw(c901.52,762.42) 904.52,762.42 904.52,772 cw(c907.52,772) 910.52,772 910.52,764.01 ccw(c913.52,764.01) 916.52,764.01 916.52,768 cw(c919.52,768) 922.52,768 ccw(c925.52,768) 925.52,765 965,765 967.35,767.35 ccw(c963.95,770.75) 968.76,770.75 968.76,778.59 ccw(c962.34,778.59) 966.88,783.12 ccw(c962.34,778.59) 962.34,785 943.54,785 cw(c943.54,793.54) 937.51,787.49 936.25,788.75 cw(c939.27,791.77) 935,791.77 RN2.4@935,830 ; 963.34,765 ccw(c963.34,769.01) 966.17,766.17
DDR_A8: RN3.4 U1.F18 | length 1532.9
  Top Layer w3: RN3.4@825,830 825,820.94 831.57,814.37 842.06,814.37 842.39,814.05 844.83,814.05 v6(846.17,812.71) ; U1.F18@835.47,520 835.47,520.29 v6(850.93,535.75)
  Int4 (Sign) w3: 709.77,816.89 ccw(c716.74,809.94) 706.9,809.94 706.9,805.87 706.9,801 cw(c703.9,801) 703.9,798 697.9,798 ccw(c697.9,795) 697.9,792 715.9,792 cw(c715.9,789) 715.9,786 697.9,786 ccw(c697.9,783) 697.9,780 715.9,780 cw(c715.9,777) 715.9,774 697.9,774 ccw(c697.9,771) 697.9,768 715.9,768 cw(c715.9,765) 715.9,762 697.9,762 ccw(c697.9,759) 697.9,756 715.9,756 cw(c715.9,753) 715.9,750 697.9,750 ccw(c697.9,747) 697.9,744 703.9,744 cw(c703.9,741) 706.9,741 706.9,739.5 706.9,734.51 ccw(c717.11,734.51) 709.89,727.3 719.42,717.77 ccw(c735.77,742.01) 735.77,712.77 741.64,712.77 ccw(c741.64,715.77) 744.64,715.77 744.64,721.77 cw(c747.64,721.77) 750.64,721.77 750.64,703.77 ccw(c753.64,703.77) 756.64,703.77 756.64,721.77 cw(c759.64,721.77) 762.64,721.77 762.64,703.77 ccw(c765.64,703.77) 768.64,703.77 768.64,721.77 cw(c771.64,721.77) 774.64,721.77 774.64,703.77 ccw(c777.64,703.77) 780.64,703.77 780.64,721.77 cw(c783.64,721.77) 786.64,721.77 786.64,703.77 ccw(c789.64,703.77) 792.64,703.77 792.64,721.77 cw(c795.64,721.77) 798.64,721.77 798.64,703.77 ccw(c801.64,703.77) 804.64,703.77 804.64,709.77 cw(c807.64,709.77) 807.64,712.77 809.14,712.77 815.6,712.77 827.98,700.4 829.04,699.34 831.7,696.67 cw(c829.58,694.55) 831.7,692.43 827.46,688.19 ccw(c829.58,686.06) 827.46,683.94 ccw(c829.58,686.06) 831.7,683.94 842.59,694.83 cw(c844.71,692.71) 846.83,694.83 cw(c844.71,692.71) 846.83,690.59 835.94,679.7 ccw(c838.06,677.58) 835.94,675.46 ccw(c838.06,677.58) 840.19,675.46 851.08,686.35 cw(c853.2,684.23) 855.32,686.35 cw(c853.2,684.23) 855.32,682.1 844.43,671.22 ccw(c846.55,669.09) 844.43,666.97 ccw(c846.55,669.09) 848.67,666.97 861.4,679.7 cw(c863.52,677.58) 865.64,679.7 cw(c863.52,677.58) 865.64,675.46 852.91,662.73 ccw(c855.04,660.61) 852.91,658.49 ccw(c855.04,660.61) 857.16,658.49 861.4,662.73 cw(c863.52,660.61) 865.64,662.73 868.04,660.33 cw(c858.79,651.09) 871.87,651.09 871.87,645.67 871.87,638.5 cw(c868.87,638.5) 868.87,635.5 862.87,635.5 ccw(c862.87,632.5) 862.87,629.5 880.87,629.5 cw(c880.87,626.5) 880.87,623.5 862.87,623.5 ccw(c862.87,620.5) 862.87,617.5 880.87,617.5 cw(c880.87,614.5) 880.87,611.5 862.87,611.5 ccw(c862.87,608.5) 862.87,605.5 880.87,605.5 cw(c880.87,602.5) 880.87,599.5 862.87,599.5 ccw(c862.87,596.5) 862.87,593.5 880.87,593.5 cw(c880.87,590.5) 880.87,587.5 862.87,587.5 ccw(c862.87,584.5) 862.87,581.5 880.87,581.5 cw(c880.87,578.5) 880.87,575.5 864.5,575.5 ccw(c864.5,572.5) 864.5,569.5 868.87,569.5 cw(c868.87,566.5) 871.87,566.5 871.87,565 871.87,556.69 cw(c850.93,556.69) v6(850.93,535.75) ; 709.78,816.9 711.67,818.78 715.14,822.26 cw(c721.51,815.89) 721.51,824.89 725.24,824.89 726.74,824.89 ccw(c726.74,827.89) 729.74,827.89 729.74,833.89 cw(c732.74,833.89) 735.74,833.89 735.74,815.89 ccw(c738.74,815.89) 741.74,815.89 741.74,833.89 cw(c744.74,833.89) 747.74,833.89 747.74,815.89 ccw(c750.74,815.89) 753.74,815.89 753.74,833.89 cw(c756.74,833.89) 759.74,833.89 759.74,815.89 ccw(c762.74,815.89) 765.74,815.89 765.74,831.48 cw(c768.74,831.48) 771.74,831.48 771.74,821.89 ccw(c774.74,821.89) 777.74,821.89 cw(c780.74,821.89) 780.74,824.89 802.14,824.89 818.46,824.89 cw(c818.46,788.72) 834.41,821.19 cw(c818.46,788.72) 835.07,820.85 cw(c818.46,788.72) 844.03,814.3 845.63,812.71 v6(846.17,812.71)
DDR_A9: RN3.3 U1.E19 | length 1526.9
  Top Layer w3: RN3.3@802.36,830 802.36,817.64 ccw(c820,817.64) v4(820,800) ; U1.E19@866.97,551.5 872.72,545.75 ccw(c886.59,559.62) 886.59,540 898.1,540 cw(c898.12,537) 898.19,540 ccw(c898.46,551.5) 898.73,540 cw(c898.8,537) 898.83,540 930,540 ccw(c930,564.14) 947.07,547.07 v4(950,550)
  Int1 (Sign) w4: v4(820,800) 802.01,817.99 800.59,819.41 ccw(c797.76,816.58) 794.93,819.41 791.75,816.23 cw(c789.28,818.7) 786.8,816.23 cw(c789.28,818.7) 786.8,821.18 798.82,833.2 ccw(c796.35,835.67) 798.82,838.15 ccw(c796.35,835.67) 793.87,838.15 781.85,826.13 cw(c779.38,828.6) 776.9,826.13 cw(c779.38,828.6) 776.9,831.08 788.92,843.1 ccw(c786.45,845.57) 788.92,848.05 ccw(c786.45,845.57) 783.97,848.05 771.95,836.03 cw(c769.48,838.5) 767,836.03 cw(c769.48,838.5) 767,840.98 779.02,853 ccw(c776.55,855.47) 779.02,857.95 ccw(c776.55,855.47) 774.07,857.95 762.05,845.93 cw(c759.58,848.4) 757.1,845.93 cw(c759.58,848.4) 757.1,850.88 769.12,862.9 ccw(c766.65,865.37) 769.12,867.85 ccw(c766.65,865.37) 764.17,867.85 752.15,855.83 cw(c749.68,858.3) 747.2,855.83 cw(c749.68,858.3) 747.2,860.78 759.22,872.8 ccw(c756.75,875.27) 759.22,877.75 ccw(c756.75,875.27) 754.28,877.75 742.25,865.72 cw(c739.78,868.2) 737.3,865.72 cw(c739.78,868.2) 737.3,870.67 740.95,874.32 ccw(c738.13,877.15) 742.13,877.15 742.13,877.87 737.84,883.66 cw(c759.33,895.08) 736.93,885.58 cw(c759.33,895.08) 735.35,890.94 cw(c759.33,895.08) 735,895.08 735,900 cw(c772.35,900) 745.93,926.4 750.76,931.24 cw(c770,912) 770,939.2 772.37,939.2 cw(c772.37,921.35) 785,933.97 788.14,930.83 789.55,929.42 ccw(c792.38,932.25) 795.21,929.42 795.56,929.77 cw(c798.04,927.3) 800.51,929.77 cw(c798.04,927.3) 800.51,924.82 791.32,915.63 ccw(c793.8,913.16) 791.32,910.68 ccw(c793.8,913.16) 796.27,910.68 805.46,919.87 cw(c807.94,917.4) 810.41,919.87 cw(c807.94,917.4) 810.41,914.92 801.22,905.73 ccw(c803.7,903.26) 801.22,900.78 ccw(c803.7,903.26) 806.17,900.78 815.36,909.97 cw(c817.84,907.5) 820.31,909.97 cw(c817.84,907.5) 820.31,905.02 811.12,895.83 ccw(c813.6,893.36) 811.12,890.88 ccw(c813.6,893.36) 816.07,890.88 825.26,900.07 cw(c827.74,897.6) 830.21,900.07 cw(c827.74,897.6) 830.21,895.12 821.02,885.93 ccw(c823.49,883.46) 821.02,880.98 ccw(c823.49,883.46) 825.97,880.98 835.16,890.17 cw(c837.64,887.7) 840.11,890.17 cw(c837.64,887.7) 840.11,885.22 830.92,876.03 ccw(c833.39,873.56) 830.92,871.08 ccw(c833.39,873.56) 835.87,871.08 845.06,880.27 cw(c847.53,877.8) 850.01,880.27 cw(c847.54,877.8) 850.01,875.32 840.82,866.13 ccw(c843.29,863.66) 840.82,861.18 ccw(c843.29,863.66) 845.77,861.18 854.96,870.38 cw(c857.43,867.9) 859.91,870.38 cw(c857.43,867.9) 859.91,865.43 850.72,856.23 ccw(c853.19,853.76) 850.72,851.28 ccw(c853.19,853.76) 855.67,851.28 864.86,860.48 cw(c867.33,858) 869.81,860.48 cw(c867.33,858) 869.81,855.53 863.8,849.52 ccw(c866.63,846.69) 863.23,844.59 869.49,834.44 cw(c774.56,802.99) 870.17,832.29 cw(c774.56,802.99) 874.56,802.99 874.56,774.25 ccw(c907.9,774.25) 874.6,772.65 ccw(c907.9,774.25) 874.83,770.05 879.33,760.86 cw(c875.74,759.1) 878.57,756.27 872.64,750.34 ccw(c875.11,747.87) 872.64,745.39 ccw(c875.11,747.87) 877.59,745.39 889.61,757.41 cw(c892.08,754.94) 894.56,757.41 cw(c892.08,754.94) 894.56,752.46 882.54,740.44 ccw(c885.01,737.97) 882.54,735.49 ccw(c885.01,737.97) 887.49,735.49 899.51,747.51 cw(c901.98,745.04) 904.46,747.51 cw(c901.98,745.04) 904.46,742.56 892.44,730.54 ccw(c894.91,728.07) 892.44,725.59 ccw(c894.91,728.07) 897.39,725.59 909.41,737.61 cw(c911.88,735.14) 914.36,737.61 cw(c911.88,735.14) 914.36,732.66 902.34,720.64 ccw(c904.81,718.17) 902.34,715.69 ccw(c904.81,718.17) 907.29,715.69 919.31,727.71 cw(c921.78,725.24) 924.26,727.71 cw(c921.78,725.24) 924.26,722.77 912.24,710.74 ccw(c914.71,708.27) 912.24,705.79 ccw(c914.71,708.27) 917.18,705.79 929.21,717.82 cw(c931.68,715.34) 934.16,717.82 cw(c931.68,715.34) 934.16,712.87 922.13,700.84 ccw(c924.61,698.37) 922.13,695.89 ccw(c924.61,698.37) 927.08,695.9 930.26,699.07 cw(c933.09,696.25) 935.98,699.01 937.31,697.63 cw(c901.72,665) 938.63,696.13 cw(c901.72,665) 946.21,683.75 cw(c901.72,665) 947,681.75 949.11,669.98 ccw(c953.05,670.69) 953.05,666.69 954.67,666.69 cw(c954.67,663.19) 954.67,659.69 941.5,659.69 ccw(c941.5,656.19) 941.5,652.69 946,652.69 cw(c946,648.69) 950,648.69 950,646.69 v4(950,550)
DDR_A10: RN4.1 U1.B20 | length 176
  Top Layer w3: U1.B20@898.46,645.98 900.98,645.98 950,695 cw(c968.06,676.94) 968.06,702.48 RN4.1@1052.17,702.48
DDR_A11: RN3.2 U1.F17 | length 1109.4
  Top Layer w3: v6(758.23,789.86) ccw(c758.23,814.3) 769.82,792.78 ccw(c758.23,814.3) 779.75,802.71 ccw(c758.23,814.3) 782.68,814.3 RN3.2@782.68,830
  Top Layer w10: U1.F17@803.98,520 805.06,520 819.72,534.67 v9(819.72,538.96)
  Int4 (Sign) w3: v6(758.23,789.86) 740.37,789.86 ccw(c740.37,784.49) 735,784.49 735,753 ccw(c750.79,753) 750.79,737.21 897.79,737.21 cw(c897.79,722.08) 912.92,722.08 912.92,717.77 912.92,705.67 ccw(c915.92,705.67) 915.92,702.67 918.87,702.67 cw(c918.87,699.67) 918.87,696.67 903.92,696.67 ccw(c903.92,693.67) 903.92,690.67 921.92,690.67 cw(c921.92,687.67) 921.92,684.67 903.92,684.67 ccw(c903.92,681.67) 903.92,678.67 921.92,678.67 cw(c921.92,675.67) 921.92,672.67 903.92,672.67 ccw(c903.92,669.67) 903.92,666.67 921.92,666.67 cw(c921.92,663.67) 921.92,660.67 903.92,660.67 ccw(c903.92,657.67) 903.92,654.67 921.92,654.67 cw(c921.92,651.67) 921.92,648.67 903.92,648.67 ccw(c903.92,645.67) 903.92,642.67 921.92,642.67 cw(c921.92,639.67) 921.92,636.67 903.92,636.67 ccw(c903.92,633.67) 903.92,630.67 921.92,630.67 cw(c921.92,627.67) 921.92,624.67 903.92,624.67 ccw(c903.92,621.67) 903.92,618.67 921.92,618.67 cw(c921.92,615.67) 921.92,612.67 903.92,612.67 ccw(c903.92,609.67) 903.92,606.67 921.92,606.67 cw(c921.92,603.67) 921.92,600.67 903.92,600.67 ccw(c903.92,597.67) 903.92,594.67 921.92,594.67 cw(c921.92,591.67) 921.92,588.67 903.92,588.67 ccw(c903.92,585.67) 903.92,582.67 921.92,582.67 cw(c921.92,579.67) 921.92,576.67 903.92,576.67 ccw(c903.92,573.67) 903.92,570.67 909.92,570.67 cw(c909.92,567.67) 912.92,567.67 912.92,566.17 912.92,561.59 cw(c887.54,561.59) 905.49,543.64 871.09,509.24 cw(c846.42,533.91) 846.42,499.02 843.44,499.02 cw(c843.44,521.85) 827.3,505.71 823.96,509.05 cw(c834.18,519.27) 820.62,514.27 cw(c834.18,519.27) 819.72,519.27 v9(819.72,538.96)
DDR_A12: RN3.1 U1.D19 | length 428.8
  Top Layer w3: RN3.1@760.04,830 ccw(c760.04,805.76) 742.9,822.9 740,820 ccw(c752.07,807.93) 735,807.93 735,795.47 735,773.5 cw(c732,773.5) 732,770.5 726.49,770.5 ccw(c726.49,767.5) 726.49,764.5 732,764.5 cw(c732,761.5) 735,761.5 735,760 ccw(c764.07,760) 743.51,739.45 748.73,734.23 ccw(c780.35,783.8) 780.35,725 863.65,725 cw(c863.65,700.31) 881.12,717.77 cw(c868.49,705.14) 886.35,705.14 886.35,675.05 cw(c875.75,675.05) 883.24,667.56 cw(c870.7,680.1) 870.7,662.36 ccw(c870.7,650.51) 862.32,658.89 857.45,654.02 ccw(c875.44,636.04) 850,636.04 850,623.96 ccw(c907.93,623.96) 858.52,593.71 ccw(c907.93,623.96) U1.D19@866.94,583.02
DDR_BA0: RN4.3 U1.H17 | length 392.5
  Top Layer w3: v6(980.57,657.89) 1049.9,657.89 RN4.3@1052.17,660.16
  Top Layer w10: U1.H17@803.98,457.01 803.98,457.45 819.1,472.57 v9(819.1,473.02)
  Int4 (Sign) w4: v9(819.1,473.02) 825.87,466.25 ccw(c849.07,489.45) 828.96,463.52 ccw(c849.07,489.45) 849.07,456.64 ccw(c849.07,500.83) 880.3,469.57 ; 880.31,469.58 965.34,554.61 ; 965.36,554.64 ccw(c929.96,590) 980,590 980,657.31 v6(980.57,657.89)
DDR_BA1: RN4.2 U1.H16 | length 462.5
  Top Layer w3: v6(989.63,678.84) 990.57,679.78 1052.11,679.78 RN4.2@1052.17,679.84
  Top Layer w10: U1.H16@772.48,457.01 772.48,457.2 788.23,472.95 v9(788.23,473.14)
  Int4 (Sign) w4: v9(788.23,473.14) 806.17,455.2 ccw(c841.21,490.24) 841.21,440.69 ccw(c841.21,509.52) 889.88,460.85 979.83,550.8 ccw(c953.9,576.74) 990.57,576.74 990.57,677.89 v6(989.63,678.84)
DDR_D0: RN5.4 U1.L18 | length 320.2
  Top Layer w3: v23(1010,320) 1012.52,322.52 RN5.4@1052.17,322.52
  Top Layer w10: v12(820.74,376.76) 820.99,376.76 835.23,362.52 U1.L18@835.47,362.52
  Int1 (Sign) w4: v12(820.74,376.76) 924.51,376.76 938.75,362.52 1016.8,362.52 1025,354.32 1025,334.75 cw(c1011.36,334.75) 1017.41,322.52 cw(c1011.36,334.75) 1011.36,321.11 ccw(c1016.09,313.9) v23(1010,320)
DDR_D1: RN5.2 U1.M19 | length 209.2
  Top Layer w3: U1.M19@866.97,331.02 ccw(c916.68,380.74) 916.68,310.43 966.13,310.43 ccw(c966.13,350.72) 975.35,311.5 ccw(c966.13,350.72) v23(994.62,322.23) ; v23(1004.56,352.52) 1005.06,353.02 1016.45,353.02 ccw(c1016.45,381.72) 1036.73,361.41 RN5.2@1040.16,364.84
  Int1 (Sign) w4: v23(994.62,322.23) 995,332.19 cw(c1022.25,332.17) 1002.98,351.44 1003.48,351.44 v23(1004.56,352.52)
DDR_D2: RN5.3 U1.L19 | length 188.5
  Top Layer w3: U1.L19@866.97,362.52 ccw(c901.72,397.27) 901.72,348.13 969.05,348.13 cw(c969.05,336.88) 977,344.84 ccw(c981.38,349.21) 981.38,343.02 1047.26,343.02 RN5.3@1049.4,345.16
DDR_D3: RN5.1 U1.L20 | length 162.2
  Top Layer w3: U1.L20@898.46,362.52 1000.5,362.52 ccw(c1000.5,405.13) 1030.62,374.99 ; 1030.63,375 1043.11,387.48 RN5.1@1052.17,387.48
DDR_D4: RN6.4 U1.L17 | length 291.8
  Top Layer w3: U1.L17@803.98,362.52 809.28,357.22 ccw(c830.87,378.81) 811.68,355.05 ccw(c830.87,378.81) 830.87,348.28 834.99,348.28 ccw(c834.99,368.29) 849.13,354.13 852.41,357.41 ccw(c843.25,366.57) 855.24,361.67 ; 855.25,361.69 ccw(c852.47,362.82) 855.47,362.76 cw(c866.97,362.52) 866.97,374.02 994.7,374.02 ccw(c994.7,401.33) 1014.01,382.01 1035.87,403.88 1043.16,411.16 ccw(c1026.65,427.68) RN6.4@1050,427.68 RN6.4@1046.94,427.68
DDR_D5: RN6.3 U1.K16 | length 326.5
  Top Layer w3: v2(1000,386.84) v2(1000,386.84) 998.51,385.3 ccw(c995,405.67) 1009.58,391.02 ccw(c995,405.67) 1009.61,391.05 1016.24,397.67 ; 1016.25,397.69 ccw(c989.87,424.04) 1027.15,424.04 1027.15,431.76 cw(c1045.79,431.76) 1032.61,444.94 RN6.3@1037.99,450.32
  Top Layer w10: U1.K16@772.48,394.02 772.48,394.26 786.72,408.5 v7(786.72,408.75)
  Int3 (Sign) w4: v7(786.72,408.75) 937.67,408.75 959.58,386.84 v2(1000,386.84)
DDR_D6: RN6.2 U1.K20 | length 201
  Top Layer w3: U1.K20@898.46,394.02 cw(c906.34,386.14) 906.34,397.28 949.14,397.28 997.89,397.28 ccw(c997.89,411.31) 1007.8,401.37 ; 1007.81,401.39 1011.92,405.5 ccw(c992.7,416.8) 1015,416.8 1015,428.54 cw(c1039.54,428.54) 1015.82,434.83 cw(c1039.54,428.54) 1022.19,445.89 1028.97,457.68 cw(c1032.87,455.43) 1029.05,457.81 1034.37,466.38 1037.99,470 RN6.2@1050,470
DDR_D7: RN6.1 U1.K17 | length 289
  Top Layer w3: v16(1020.32,462.69) 1020.32,471.22 cw(c1038.4,471.22) 1020.67,474.77 cw(c1038.4,471.22) 1025.61,484.01 cw(c1030.58,479.04) 1030.58,486.07 1034.14,486.07 ccw(c1034.14,508.5) RN6.1@1050,492.64
  Top Layer w10: U1.K17@803.98,394.02 v12(819.72,409.76)
  Int1 (Sign) w4: v12(819.72,409.76) 836.84,426.88 cw(c868.51,395.21) 868.51,440 959.68,440 ccw(c959.68,490.58) 990.4,450.4 ccw(c959.68,490.58) 995.44,454.82 cw(c1014.45,435.81) 1014.45,462.69 v16(1020.32,462.69)
DDR_D8: RN8.4 U1.K19 | length 1646.1
  Top Layer w3: RN8.4@619.33,1247.36 628.39,1247.36 644.41,1231.34 ; U1.K19@866.97,394.02 cw(c894.73,366.25) 891.1,405.35 896.26,405.35 ccw(c896.26,408.35) 896.72,405.38 cw(c898.46,394.02) 898.46,405.52 cw(c898.46,394.02) 900.21,405.38 ccw(c900.67,408.35) 900.67,405.35 916.22,405.35 948.78,405.35 978.77,405.35 ccw(c978.77,421.23) v23(990,410)
  Int1 (Sign) w4: v4(650,1230) 667.05,1230 676,1230 ccw(c676,1234) 680,1234 680,1238.5 cw(c683.5,1238.5) 687,1238.5 687,1221.5 ccw(c690.5,1221.5) 694,1221.5 694,1238.5 cw(c697.5,1238.5) 701,1238.5 701,1221.5 ccw(c704.5,1221.5) 708,1221.5 708,1238.5 cw(c711.5,1238.5) 715,1238.5 715,1221.5 ccw(c718.5,1221.5) 722,1221.5 722,1225.66 cw(c726,1225.66) 726.22,1229.66 728,1229.56 cw(c720,1157.57) 730,1229.31 cw(c720,1157.57) 771.21,1208.79 866.04,1113.96 871.77,1108.23 ccw(c874.6,1111.06) 877.43,1108.23 879.68,1110.48 cw(c882.15,1108) 884.63,1110.48 cw(c882.15,1108) 884.63,1105.53 874.47,1095.37 ccw(c876.95,1092.9) 874.47,1090.42 ccw(c876.95,1092.9) 879.42,1090.42 889.58,1100.58 cw(c892.05,1098.1) 894.52,1100.58 cw(c892.05,1098.1) 894.52,1095.63 884.37,1085.48 ccw(c886.85,1083) 884.37,1080.53 ccw(c886.85,1083) 889.32,1080.53 899.47,1090.68 cw(c901.95,1088.2) 904.42,1090.68 cw(c901.95,1088.2) 904.42,1085.73 894.27,1075.58 ccw(c896.75,1073.1) 894.27,1070.63 ccw(c896.75,1073.1) 899.22,1070.63 909.37,1080.78 cw(c911.85,1078.3) 914.32,1080.78 cw(c911.85,1078.3) 914.32,1075.83 904.17,1065.68 ccw(c906.65,1063.2) 904.17,1060.73 ccw(c906.65,1063.2) 909.12,1060.73 911.37,1062.97 cw(c914.2,1060.14) 917.03,1062.97 918.44,1061.56 1149.44,830.56 cw(c1099.64,780.86) 1170,780.86 1170,504.14 cw(c1135.86,504.14) 1160.02,480.02 1092.92,412.92 cw(c1075,430.85) 1075,405.5 1000.86,405.5 cw(c1000.86,420.86) v23(990,410)